# Altium PCB PCB1.PcbDoc (part 2 of 2)
Units mil, origin at the board's own origin, x right, y up, seen from the top; angles counter-clockwise.
Board outline 1968.5 x 1968.5 mil, 4 copper layers (Top Layer, Layer 2, Layer 3, Bottom Layer), stack 23.756 mil thick; 70 components, 47 nets, 261 pads, 125 vias.
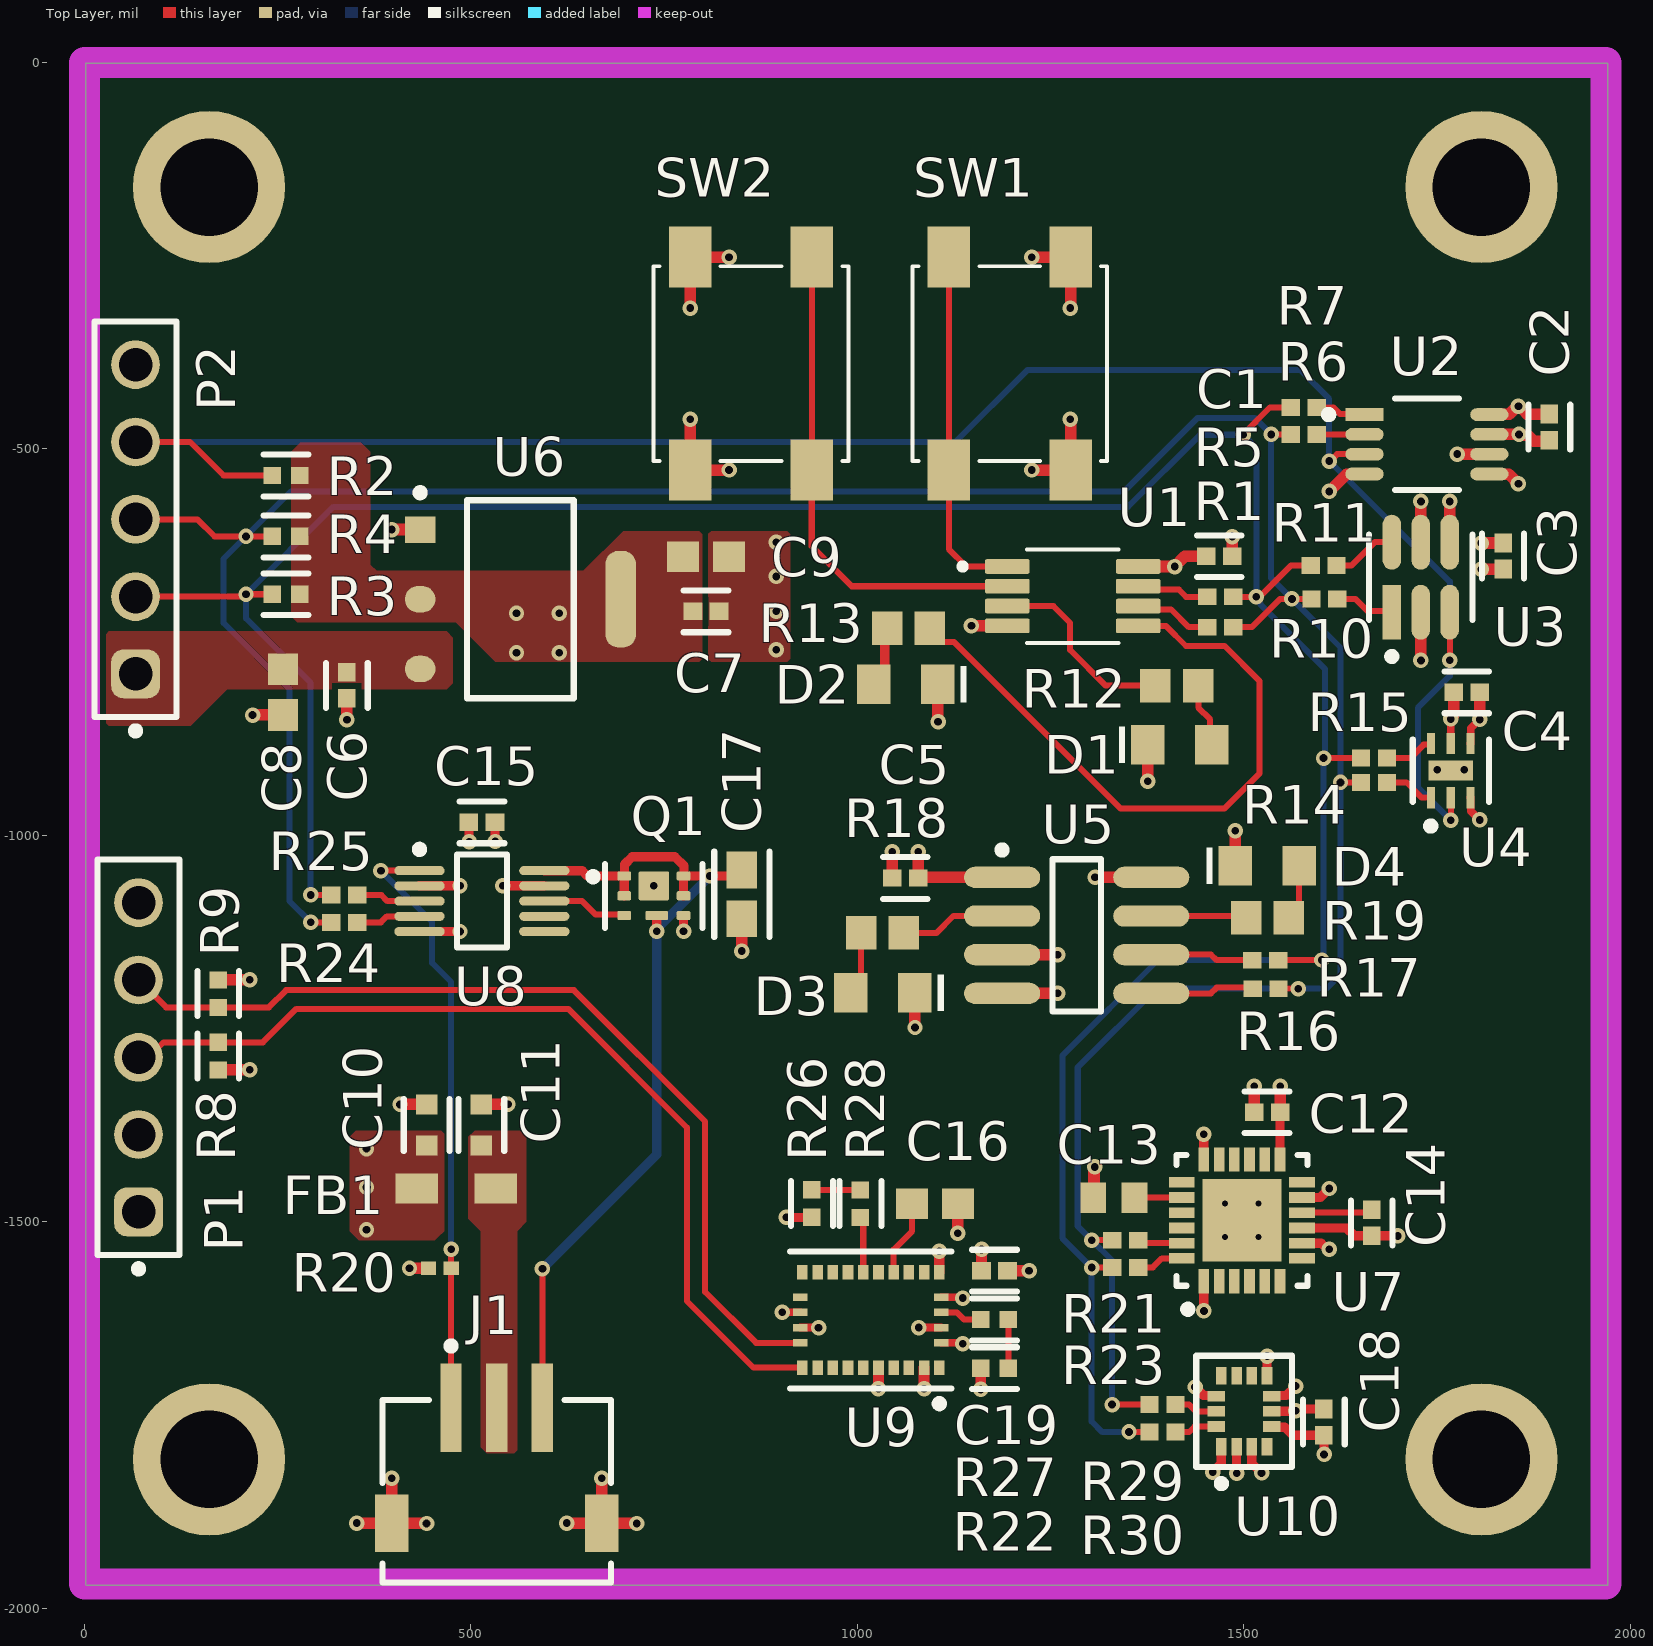
[diagram p0: Top Layer view]

## Polygon pours and split planes (outlines as drawn) (continued)
GND on Top Layer "GND_L01_P004" (solid, pour order 4): 807.09,-610.24 807.09,-771.65 811.02,-775.59 909.45,-775.59 913.39,-771.65 913.39,-610.24 909.45,-606.3 811.02,-606.3
3V3_SYS on Top Layer "3V3_SYS_L01_P003" (solid, pour order 3): 645.67,-657.48 696.85,-606.3 795.28,-606.3 799.21,-610.24 799.21,-771.65 795.28,-775.59 531.5,-775.59 480.31,-724.41 275.59,-724.41 267.72,-716.54 267.72,-503.94 279.53,-492.13 358.27,-492.13 370.08,-503.94 370.08,-649.61 377.95,-657.48
5V on Top Layer "5V_L01_P000" (solid, pour order 0): 23.62,-744.09 23.62,-850.39 31.5,-858.27 137.8,-858.27 185.04,-811.02 468.5,-811.02 476.38,-803.15 476.38,-744.09 468.5,-736.22 31.5,-736.22 27.56,-740.16
GND on Layer 2 "GND_L02_P006" (solid, pour order 6): 1.97,-1969.61 1970.47,-1969.61 1970.47,-1.1 1.97,-1.1
5V on Bottom Layer "5V_L04_P007" (solid, pour order 7): 35,-750 35,-1575 55,-1595 430,-1595 450,-1575 450,-1240 355,-1145 255,-1145 235,-1125 235,-800 170,-735 50,-735
3V3_SYS on Layer 3 "3V3_SYS_L03_P008" (solid, pour order 8): 1.97,-1969.61 1970.47,-1969.61 1970.47,-1.1 1.97,-1.1

## Keep-outs
Keep-Out Layer:
  lines w40: 0,-1968.5 1968.5,-1968.5 1968.5,0 0,0 0,-1968.5

## Silkscreen, mask and mechanical layers (free items; w line width, h text height)
Mechanical 1:
  the board outline again, w5

## Dimensions
1.97,-1.1 to 1.97,-1969.61 on Mechanical 1
1.97,-1.1 to 1970.47,-1.1 on Mechanical 1